# Altium PCB PCB1.PcbDoc
Units mm, origin at the board's own origin, x right, y up, seen from the top; angles counter-clockwise.
Board outline 152.4 x 101.6 mm, 2 copper layers (Top Layer, Bottom Layer); 131 components, 94 nets, 502 pads, 3 vias.
Unrouted connection lines stored in the file: 261.
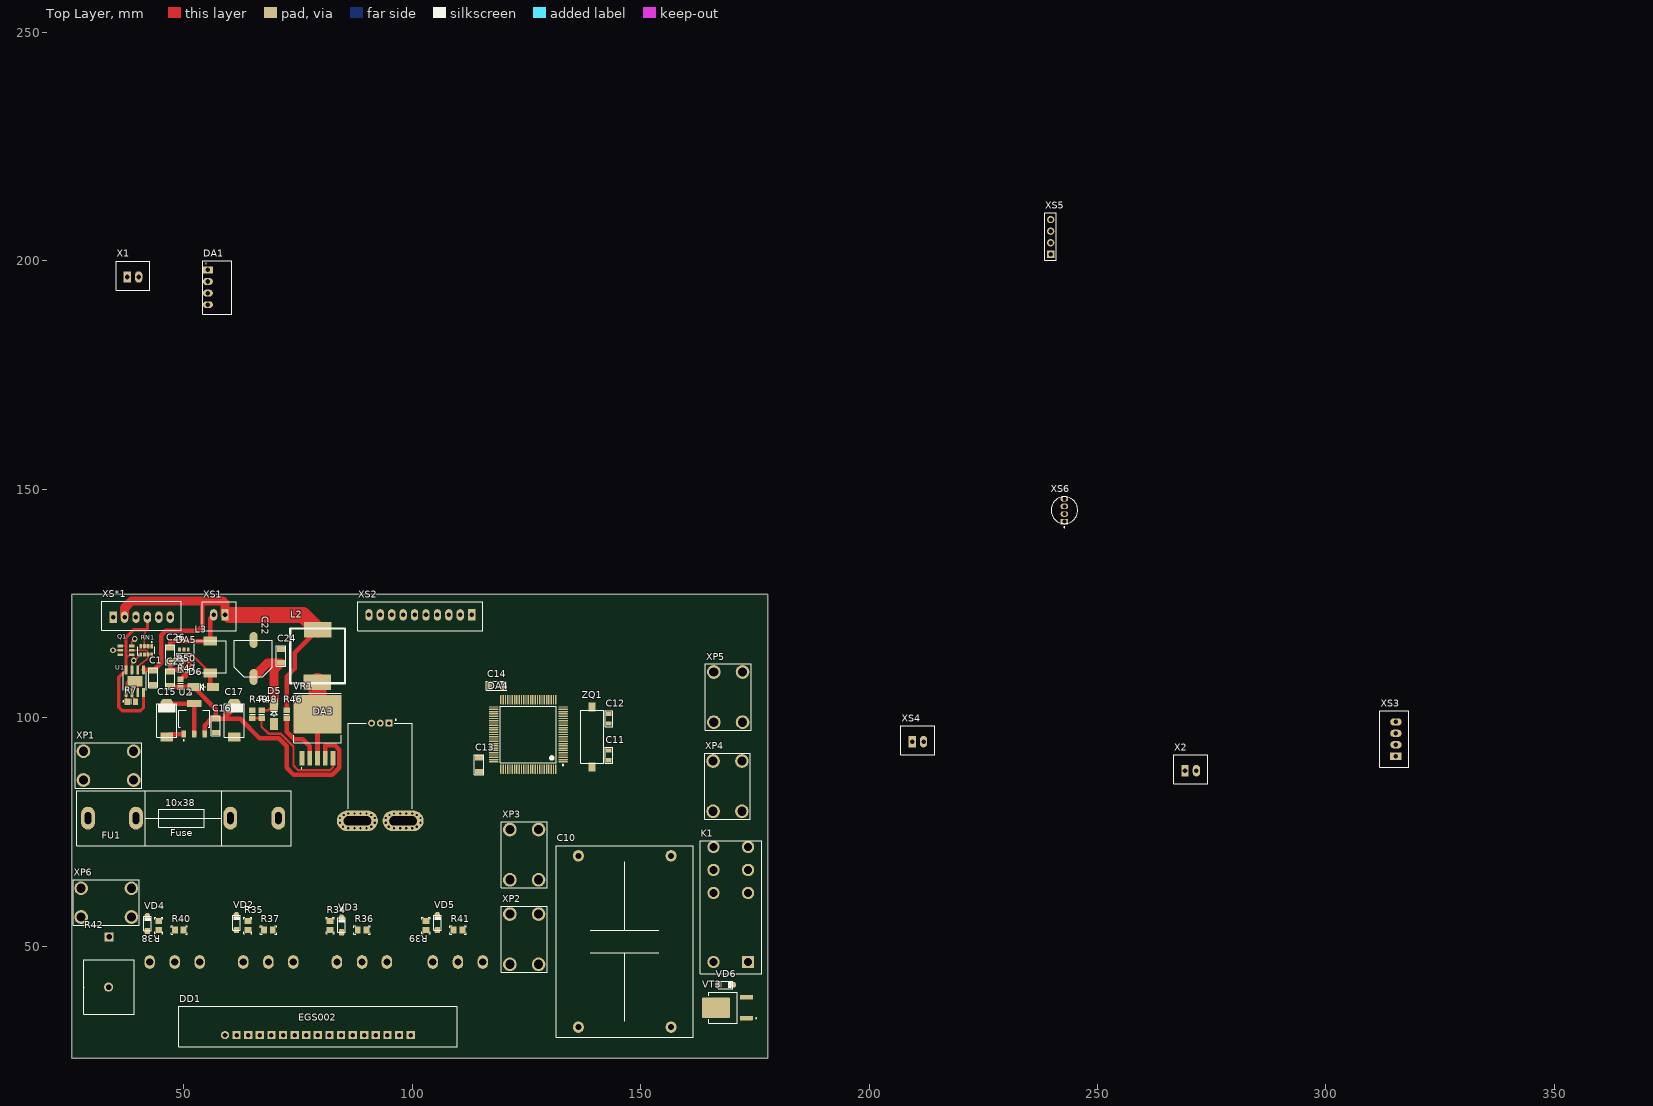
[diagram p0: Top Layer view]
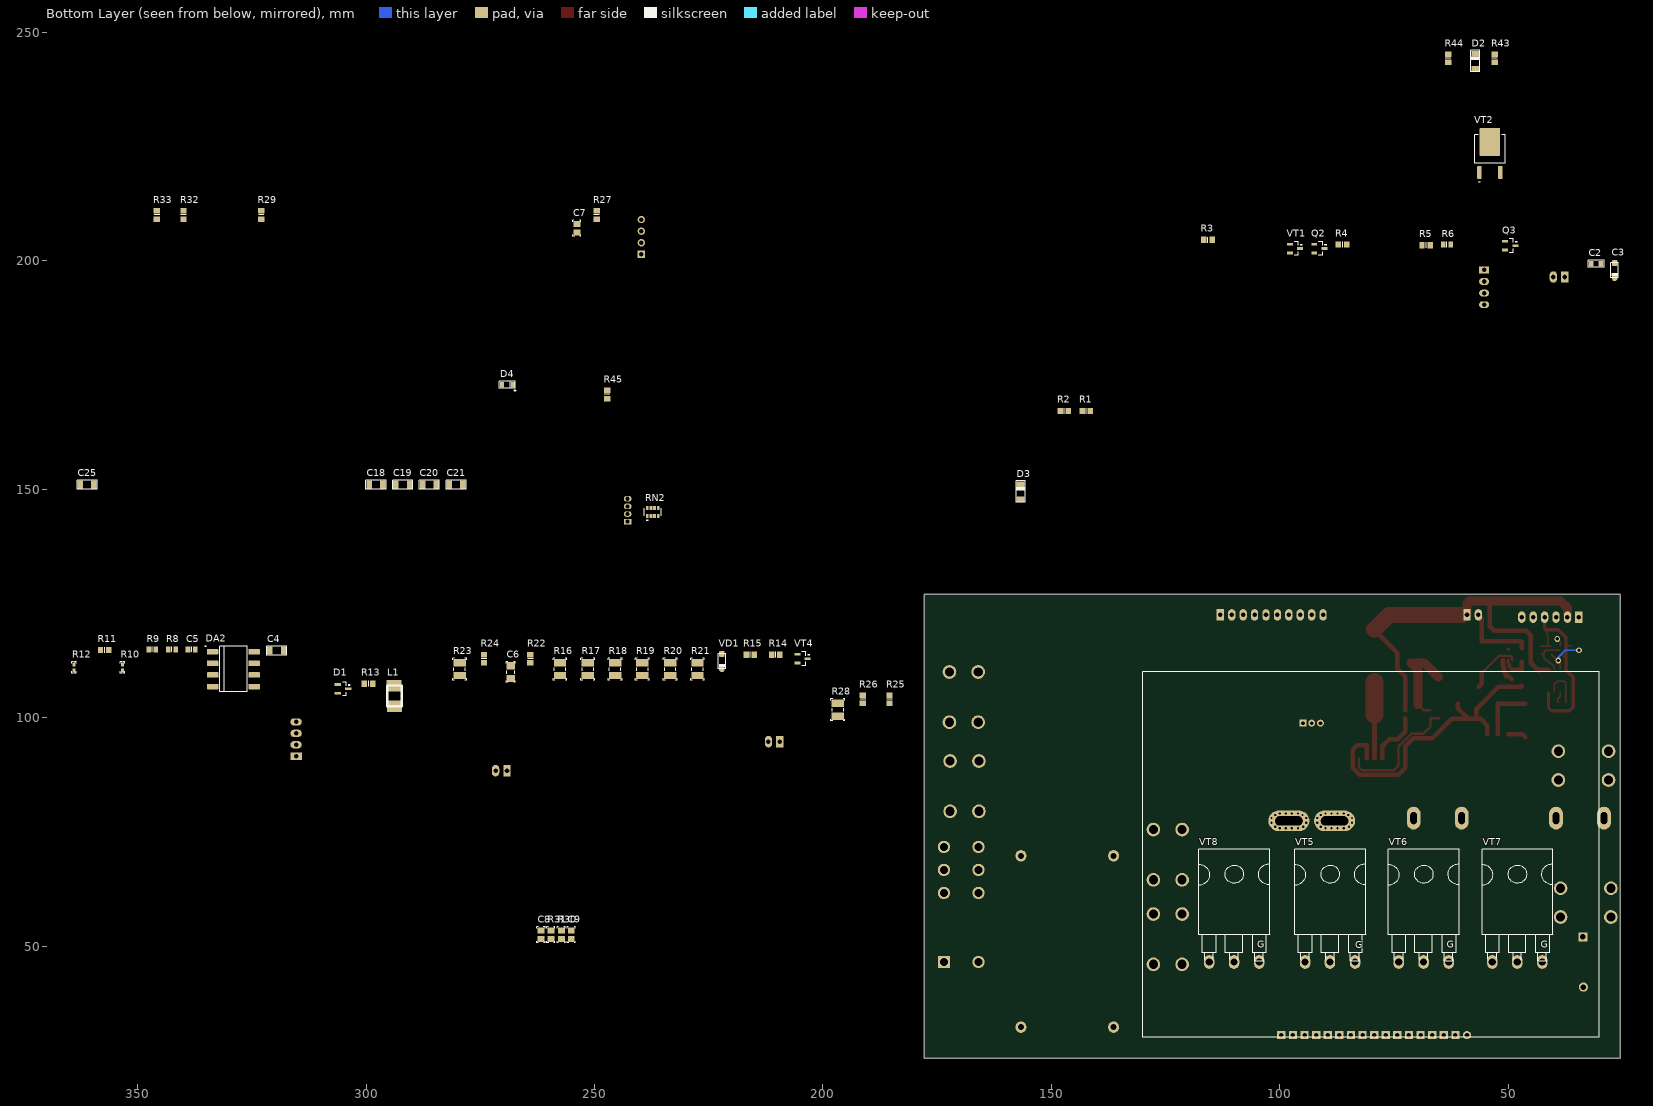
[diagram p1: Bottom Layer view, seen from below]

## Layer stack, top to bottom
Top Solder: solder mask 0.0102, Solder Resist, Dk 3.5
Top Layer: signal copper 0.0356
Dielectric 1: dielectric 0.32, FR-4, Dk 4.8
Bottom Layer: signal copper 0.0356
Bottom Solder: solder mask 0.0102, Solder Resist, Dk 3.5

## Board outline
25.4,25.4 177.8,25.4 177.8,127 25.4,127

## Design rules (kind name [scope] priority, off if disabled: settings)
Clearance [All] p1: gap=0.254 ignorepadtopadclearanceinfootprint=FALSE except(0: Arc-Hole Track-Hole SMDPad-Hole THPad-Hole Via-Hole Fill-Hole Poly-Hole Region-Hole Text-Hole)
DiffPairsRouting [All] p1: maxlimit=0.254 minlimit=0.254 mostfreqgap=0.254 toplayer_minwidth=0.381 toplayer_maxwidth=0.381 toplayer_prefwidth=0.381 bottomlayer_minwidth=0.381 bottomlayer_maxwidth=0.381 bottomlayer_prefwidth=0.381 maxuncoupledlength=12.7
PlaneConnect [All] p1: planeconnectstyle=Direct reliefexpansion=0.508 reliefentries=4 reliefconductorwidth=0.254 reliefairgap=0.254
PolygonConnect [All] p1: connectstyle=Direct reliefconductorwidth=0.254 reliefentries=4 polygonreliefangle="90 Angle" airgapwidth=0.254
RoutingVias [All] p1: holewidth=0.711 width=1.27 viastyle="Through Hole" minholewidth=0.711 minwidth=1.27 maxholewidth=0.711 maxwidth=1.27
SolderMaskExpansion [All] p1: expansion=0.102
Width [All] p1: maxlimit=10 minlimit=0.254 preferedwidth=0.254
28 further rules are at their usual default settings.

## Classes and differential pairs
component class Designator: DD1
differential pair CANRX: +CANRX_P -CANRX_N
differential pair CAN: +CAN_P -CAN_N
differential pair UART: +UART_P -UART_N

## Components (designator, comment, footprint, x,y, rotation, side; value= is the part's Value field where it differs from the comment)
C1 "1206" 1206C 43.25,110.25 r270 top value=10µF
C2 "100 nF" 0805_old 31.75,199.39 r180 bottom
C3 "TAJA226K010RNJ" "SMDA Tantal Polar" 26.67,196.342 r90 bottom
C4 "10 mkF" 1206C 321.056,114.681 r180 bottom
C5 "100 nF" 6-0805_L 338.201,114.935 r180 bottom
C6 "0.01u" 3216[1206] 268.351,109.982 r90 bottom value=0.1
C7 "0.1u" 2012[0805] 253.873,207.137 r90 bottom value=0.1
C8 "0.1" 2012[0805] 261.705,52.485 r270 bottom
C9 "0.1" 2012[0805] 255.101,52.485 r90 bottom
C10 "30u" B32776G 146.5,51 r270 top value=0.1м
C11 "30 pF" 0805_old 143.053,90.735 r90 top
C12 "30 pF" 0805_old 143.053,100.768 r270 top
C13 "10 mkF" 1206C 114.605,91.195 r270 top
C14 "10 mkF" 1206C 119.939,106.991 r180 top
C15 "47mkF 25V" "SMDD Tantal Polar" 46.25,103.05 r270 top
C16 "1206" 1206C 57,99.75 r270 top value=10µF
C17 "100mkF 16V" "SMDD Tantal Polar" 61,103.05 r270 top
C18 "10 mkF" 1206C 299.339,151.003 r180 bottom
C19 "10 mkF" 1206C 293.497,151.003 r180 bottom
C20 "10 mkF" 1206C 287.655,151.003 r180 bottom
C21 "10 mkF" 1206C 281.813,151.003 r180 bottom
C22 "220mkF 50V" "ECAP 220 35V" 61.05,108.9 r0 top
C23 "10 mkF" 1206C 47,107 r90 top
C24 "1µF" 1206C 71.25,115 r270 top
C25 "1206" 1206C 362.585,151.003 r180 bottom value=10µF
C26 "10 mkF" 1206C 47,115.25 r270 top
D1 "PESD1CAN,215" SOT23_M 305.054,106.299 r180 bottom
D2 "1N5819HW-7-F" "1206C Diode" 57.15,242.062 r90 bottom
D3 "1N5819HW-7-F" "1206C Diode" 156.718,147.828 r90 bottom
D4 "FYLS-0805UAC" 0805_3V3 270.058,172.88 r180 bottom
D5 "1N5824" "*DO214_SS14(Primary) - duplicate" 69.75,100.75 r90 top
D6 "SS34" "*DO214_SS14(Primary) - duplicate" 54.25,106.75 r180 top
DA1 "B0505S-1WR3" SIP4 55.245,196.723 r0 top
DA2 "ISO1050DUBR" ISO1050 329.057,110.617 r180 bottom
DA3 "ACS758" ACS758 92.99,98.8 r180 top
DA4 "STM32F407VET6" STM-LQFP100_M 125.4,96.323 r0 top
DA5 "" SOT23-6_L 50,113.75 r90 top
DD1 "EGS002" EGS002 59,30.5 r90 top
FU1 "10x38 20A (2xCQ-216)" "Fuse 10x38" 39.5,78 r0 top
K1 "G2RL1E24DC" G2RL1E24DC 173.5,46.5 r90 top
L1 "470mH" LQH43CN471K 298.196,104.775 r90 bottom
L2 "AC1050" CDRH127/LDNP-680MC 79.25,113.5 r270 top value=KSE-CD127NP-330MC
L3 "470mH" "MT3608 IND" 55.75,109.8 r90 top
Q1 "BC857BS,115" SOT95P280X145-6N 37.345,114.75 r180 top
Q2 "" SOT23_N 91.313,202.692 r180 bottom
Q3 "IRLML6244" SOT23_N 49.53,203.327 r180 bottom
R1 "330 Om" 6-0805_N 142.367,167.132 r180 bottom
R2 "10kOm" 6-0805_N 147.193,167.132 r180 bottom
R3 "10kOm" 6-0805_N 115.697,204.597 r180 bottom
R4 "330 Om" 6-0805_N 86.233,203.581 r180 bottom
R5 "330 Ом" 6-0805_N 67.945,203.454 r180 bottom
R6 "4k7" 6-0805_L 63.373,203.581 r180 bottom
R7 "0805" 6-0805_N 38.5,103.5 r0 top value="510 Om"
R8 "*" 6-0805_L 342.519,114.935 r180 bottom
R9 "*" 6-0805_L 346.837,114.935 r180 bottom
R10 "*" 1005[0402] 353.314,110.998 r90 bottom
R11 "120 Ом" 6-0805_N 357.251,114.808 r180 bottom
R12 "*" 1005[0402] 363.982,110.998 r90 bottom
R13 "0805" 6-0805_N 299.466,107.442 r180 bottom value="220 om"
R14 "0805" 6-0805_N 210.312,113.792 r180 bottom value="1.3 kOm"
R15 "0805" 6-0805_N 215.9,113.792 r180 bottom value=10k
R16 "*" 3225[1210] 257.556,110.617 r90 bottom
R17 "*" 3225[1210] 251.46,110.617 r90 bottom
R18 "*" 3225[1210] 245.491,110.617 r90 bottom
R19 "*" 3225[1210] 239.522,110.617 r90 bottom
R20 "*" 3225[1210] 233.426,110.617 r90 bottom
R21 "*" 3225[1210] 227.457,110.617 r90 bottom
R22 "0805" 6-0805_N 264.033,112.903 r90 bottom value=330Om
R23 "*" 3225[1210] 279.527,110.617 r90 bottom
R24 "0805" 6-0805_N 274.193,112.903 r90 bottom value="2.7 kOm"
R25 "0805" 6-0805_N 185.42,104.013 r90 bottom value=1k
R26 "4.7kOm" 6-0805_N 191.262,104.013 r90 bottom
R27 "10k" 6-0805_N 249.555,210.058 r90 bottom
R28 "*" 3225[1210] 196.723,101.727 r90 bottom
R29 "0805" 6-0805_N 322.961,210.058 r90 bottom value=47k
R30 "*" 2012[0805] 257.26,52.485 r270 bottom
R31 "*" 2012[0805] 259.546,52.485 r90 bottom
R32 "4.7kOm" 6-0805_N 339.979,210.058 r90 bottom
R33 "0805" 6-0805_N 345.821,210.058 r90 bottom value=47k
R34 "*" 2012[0805] 82,54.5 r270 top
R35 "*" 2012[0805] 64,54.5 r270 top
R36 "*" 2012[0805] 89,53.5 r0 top
R37 "*" 2012[0805] 68.5,53.5 r0 top
R38 "*" 2012[0805] 44.5,54.5 r270 top
R39 "*" 2012[0805] 103,54.5 r270 top
R40 "*" 2012[0805] 49,53.5 r0 top
R41 "*" 2012[0805] 110,53.5 r0 top
R42 "0.1" "5W-0.1 draw" 33.6,47.013 r270 top
R43 "4.7kOm" 6-0805_N 52.959,244.348 r90 bottom
R44 "4.7kOm" 6-0805_N 63.119,244.348 r90 bottom
R45 "1kOm" 6-0805_N 247.25,170.75 r90 bottom
R46 "0805" 6-0805_N 72.5,100.75 r90 top value=1kOm
R47 "0805" 6-0805_N 49.25,107.5 r270 top value=8.2k
R48 "0805" 6-0805_N 67,100.75 r90 top value=6.8kOm
R49 "0805" 6-0805_N 65,100.75 r270 top value=1.1kOm
R50 "0805" 6-0805_N 50,110.5 r0 top value=1.1k
RN1 "*" RESCAV80P320X160X70-8N 41.75,114.75 r270 top value=YC164-JR-071KL
RN2 "*" RESCAV80P320X160X70-8N 237.25,145 r90 bottom value=YC164-JR-07200RL
U1 "*" SOP127P600X175-9N 39.25,108 r90 top
U2 "AMS1117" SOT229P700X180-4N 52.25,99.75 r90 top
VD1 "SK-24" "SMDA diode" 222.123,110.744 r90 bottom
VD2 "*" "SMDA diode" 61.5,56.7 r270 top
VD3 "*" "SMDA diode" 84.5,56.2 r270 top
VD4 "*" "SMDA diode" 42,56.5 r270 top
VD5 "*" "SMDA diode" 105.5,56.7 r270 top
VD6 "*" "SMDA diode" 170.2,41.5 r180 top
VR1 "*" xl6009 79.25,97.25 r90 top
VT1 "IRLM0040" SOT23_N 96.647,202.692 r180 bottom
VT2 "*" DPAK229P990X239-3N 53.975,223.52 r90 bottom
VT3 "*" DPAK229P990X239-3N 169.01,36.5 r180 top
VT4 "IRLM0040" SOT23_N 204.47,112.903 r180 bottom
VT5 "VT Transistor IGBT" to247-hor 89,46.5 r180 bottom
VT6 "VT Transistor IGBT" to247-hor 68.5,46.5 r180 bottom
VT7 "VT Transistor IGBT" to247-hor 48,46.5 r180 bottom
VT8 "VT Transistor IGBT" to247-hor 110,46.5 r180 bottom
X1 "fan" CWF-2 37.592,196.469 r0 top
X2 "NTC/10K" CWF-2 269.153,88.392 r0 top
XP1 "AB+" "K13 М4*9(DECA SwitchLab)" 33.5,89.5 r90 top
XP2 "L1" "K13 М4*9(DECA SwitchLab)" 124.5,51.5 r180 top
XP3 "L2" "K13 М4*9(DECA SwitchLab)" 124.5,70 r180 top
XP4 "230" "K13 М4*9(DECA SwitchLab)" 169,85 r0 top
XP5 "230" "K13 М4*9(DECA SwitchLab)" 169.15,104.5 r0 top
XP6 "AB-" "K13 М4*9(DECA SwitchLab)" 33,59.5 r270 top
XS1 "WJ15EDGVC-3.5-2P" CWF-2 59,122.5 r180 top
XS2 "CWF-10R" CWF-10 113,122.5 r180 top
XS3 "CWF-4" CWF-4 315.341,91.567 r90 top
XS4 "WJ15EDGVC-3.5-2P" CWF-2 209.423,94.742 r0 top
XS5 "WJ15EDGVC-3.5-4P" "PLS-4 - duplicate" 239.75,201.42 r90 top
XS6 "5 RGB 500-1000mcd" "5 RGB 500-1000mcd" 242.75,145.415 r90 top
XS*1 "*" CWF-6 34.5,122 r0 top
ZQ1 "HC-49S" "HC 49SM" 139.37,98.228 r270 top

## Footprints (in the part's own frame and the unit in brackets; to place one, negate y for a bottom-side part, rotate by r counter-clockwise, add the part's x,y. Pads: shape width x height; smd on the part's side, far side on the other; paste and mask are expansions set on the pad)
"5 RGB 500-1000mcd" [mm]
  rect 1.2x1.7 hole 0.9: 1(-2.505,0)
  oval 1.2x1.7 hole 0.9: 2(-0.835,0) 3(0.835,0) 4(2.505,0)
  silkscreen extent -3.8,-2.93 2.92,2.93, body extent -3.18,-3.18 3.18,3.18, height 15
"5W-0.1 draw" [mm]
  rect 2x2 hole 1.2: 1(-5,0)
  round 2 hole 1.2: 2(6.013,-0.1)
  silkscreen extent 0,-5.5 12.03,5.5
6-0805_L [mm] "Chip Resistor, Body 2.0x1.2mm, IPC High Density"
  rect 1x1.3 smd: 1(-0.8,0) 2(0.8,0)
  silkscreen extent 0,-0.55 0,0.55, body extent -1.07,-0.7 1.07,0.7, height 0.7
6-0805_N [mm] "Chip Resistor, Body 2.0x1.2mm, IPC Medium Density"
  rect 1.2x1.4 smd: 1(-0.9,0) 2(0.9,0)
  silkscreen extent 0,-0.6 0,0.6, body extent -1.07,-0.7 1.07,0.7, height 0.7
0805_3V3 [mm]
  rect 0.9x1.2 smd: 1(-0.2,0) 2(2.2,0)
  silkscreen extent -0.75,-1.37 2.77,0.8, body extent -0.05,-0.7 2.1,0.7, height 0.7
0805_old [mm]
  rect 0.9x1.2 smd: 1(-0.05,0) 2(2.05,0)
  silkscreen extent -0.75,-0.8 2.75,0.8, body extent -0.07,-0.67 2.08,0.73, height 0.7
1005[0402] [mm] "Chip Resistor; Body 1.1 x 0.5 mm (LxW typ)"
  rect 0.9x0.7 smd: 1(-0.65,0) 2(0.65,0)
  silkscreen extent -1.27,-0.51 1.27,0.51, body extent -0.51,-0.25 0.51,0.25, height 0.41
1206C [mm]
  rect 1.2x1.8 smd: 1(0,0) 2(3,0)
  silkscreen extent -0.7,-1 3.7,1, body extent -0.1,-0.8 3.1,0.76, height 1.73
"1206C Diode" [mm]
  rect 1.2x1.8 smd: 1(0,0) 2(3.3,0)
  silkscreen extent -0.7,-1 4,1, body extent 0.07,-0.78 3.27,0.78, height 1.73
2012[0805] [mm] "Chip Resistor; Body 2.0 x 1.3 mm (LxW typ)"
  rect 1.3x1.5 smd: 1(-0.95,0) 2(0.95,0)
  silkscreen extent -1.78,-0.89 1.78,0.89, body extent -1.02,-0.64 1.02,0.64, height 0.5
3216[1206] [mm] "Chip Resistor; Body 3.2 x 1.6 mm (LxW typ)"
  rect 1.6x1.8 smd: 1(-1.4,0) 2(1.4,0)
  silkscreen extent -2.29,-1.02 2.29,1.02, body extent -1.52,-0.76 1.52,0.76, height 0.5
3225[1210] [mm] "Chip Resistor; Body 3.2 x 2.5 mm (LxW typ)"
  rect 1.6x2.7 smd: 1(-1.4,0) 2(1.4,0)
  silkscreen extent -2.41,-1.52 2.41,1.52, body extent -1.52,-1.29 1.52,1.25, height 0.71
"*DO214_SS14(Primary) - duplicate" [mm]
  rect 2.65x1.75 smd: 1(-2.15,0) 2(2.15,0)
  silkscreen extent -0.57,-0.7 3.02,1.72, body extent -2.64,-1.81 2.7,1.81, height 2.65
ACS758 [mm]
  rect 1.5x1.5 / inner round 1.5 / far side rect 1.5x1.5 hole 0.8: 1(-1.91,0)
  round 1.5 hole 0.8: 2(0,0) 3(1.91,0)
  oval 9x4.5 hole 2 slot 6 at 0 deg: 4(5,21.4) 5(-5,21.4)
  round 0.8 hole 0.5: 4_1(3,19.8) 4_2(4.33,19.8) 4_3(5.66,19.8) 4_4(6.99,19.8) 4_5(8,20.13) 4_6(8.8,20.75) 4_7(8.8,21.8) 4_8(8.15,22.7) 4_9(6.99,23) 4_10(5.66,23) 4_11(4.33,23) 4_12(3,23) 4_13(2,22.7) 4_14(1.2,21.8) 4_15(1.2,20.75) 4_16(2,20.13) 5_1(-7,19.8) 5_2(-5.67,19.8) 5_3(-4.34,19.8) 5_4(-3.01,19.8) 5_5(-8,20.13) 5_6(-8.8,20.75) 5_7(-8.8,21.8) 5_8(-8,22.7) 5_9(-7,23) 5_10(-5.67,23) 5_11(-4.34,23) 5_12(-3.01,23) 5_13(-1.85,22.7) 5_14(-1.2,21.8) 5_15(-1.2,20.75) 5_16(-2,20.13)
  silkscreen extent -7,-0.82 7,18.76, body extent -7.25,0.13 6.75,22.71, height 7.1
B32776G [mm] "EPCOS CAP"
  oval 2.5x2.4 hole 1.3: 1(-18.75,10.15) 1(-18.75,-10.15) 2(18.75,10.15) 2(18.75,-10.15)
  silkscreen extent -21,-15 21,15
CDRH127/LDNP-680MC [mm]
  rect 3.4x6 smd: 1(-5.75,0.05) 2(5.725,-0.025)
  silkscreen extent -6,-6 6,6, body extent -5.95,-6.02 6,5.92, height 8
CWF-2 [mm]
  rect 1.6x2.5 hole 1: 1(0,0)
  oval 1.6x2.5 hole 1: 2(2.5,0)
  silkscreen extent -2.45,-2.85 4.95,3.5, body extent -2.45,-2.85 4.95,3.47, height 8
CWF-4 [mm]
  rect 1.6x2.5 hole 1: 1(0,0)
  oval 1.6x2.5 hole 1: 2(2.5,0) 3(5,0) 4(7.5,0)
  silkscreen extent -2.45,-2.85 9.95,3.5, body extent -2.45,-2.85 9.95,3.47, height 8
CWF-6 [mm]
  rect 1.6x2.5 hole 1: 1(0,0)
  oval 1.6x2.5 hole 1: 2(2.5,0) 3(5,0) 4(7.5,0) 5(10,0) 6(12.5,0)
  silkscreen extent -2.45,-2.85 14.95,3.5, body extent -2.42,-2.83 14.95,3.5, height 8
CWF-10 [mm]
  rect 1.6x2.5 hole 1: 1(0,0)
  oval 1.6x2.5 hole 1: 2(2.5,0) 3(5,0) 4(7.5,0) 5(10,0) 6(12.5,0) 7(15,0) 8(17.5,0) 9(20,0) 10(22.5,0)
  silkscreen extent -2.45,-2.85 24.95,3.5, body extent -2.42,-2.83 24.95,3.5, height 8
DPAK229P990X239-3N [mm]
  rrect25% 2.83x0.97 smd: 1(-4.14,2.29) 3(-4.14,-2.29)
  rrect10% 6.1x4.49 smd paste-4: 2(2.51,0)
  silkscreen extent -6.35,-3.37 4.1,3.37
"ECAP 220 35V" [mm] "TO, Thru-Hole, Vertical, Heatsink Mounted; 3 In-Line Leads; Pitch 2.54 mm"
  oval 1.8x3.5 smd: 1(4.2,0) 2(4.2,8.1)
  silkscreen extent 0,0 8.3,8, body extent 0,0 8.3,8.02, height 10.5
EGS002 [mm]
  round 1.8 hole 1: 1(0,0)
  rect 1.8x1.8 / inner round 1.8 / far side rect 1.8x1.8 hole 1: 2(0,-2.54) 3(0,-5.08) 4(0,-7.62) 5(0,-10.16) 6(0,-12.7) 7(0,-15.24) 8(0,-17.78) 9(0,-20.32) 10(0,-22.86) 11(0,-25.4) 12(0,-27.94) 13(0,-30.48) 14(0,-33.02) 15(0,-35.56) 16(0,-38.1) 17(0,-40.64)
  silkscreen extent -2.54,-50.8 6.35,10.16, body extent -0.15,-50.82 4.95,10.18, height 32
"Fuse 10x38" [mm]
  oval 3x5 hole 1.4 slot 2.6 at 90 deg: 1(-10.5,0) 1(0,0) 2(20.67,0) 2(31.17,0)
  silkscreen extent -13,-6.1 34,6
G2RL1E24DC [mm] "relay"
  round 2.7 hole 1.7: 1(0,7.56) 2(15.12,7.56) 3(20.16,7.56) 4(25.2,7.56) 5(25.2,0) 6(20.16,0) 7(15.12,0)
  rect 2.7x2.7 hole 1.7: 8(0,0)
  silkscreen extent -2.6,-3 26.5,10.5, body extent -2.6,-3 26.5,10.5, height 15.7
"HC 49SM" [mm]
  rect 2x1.5 smd: 1(-4.125,0) 2(9,0)
  silkscreen extent -3.37,-2.52 8.25,2.58, body extent -3.37,-2.5 8.25,2.58, height 4
ISO1050 [mm]
  rrect25% 2.5x1.2 smd: 1(-4.535,3.81) 2(-4.535,1.27) 3(-4.535,-1.27) 4(-4.535,-3.81) 5(4.535,-3.81) 6(4.535,-1.27) 7(4.535,1.27) 8(4.535,3.81)
  silkscreen extent -6.2,-5 3,5.1, body extent -5.28,-4.67 5.12,4.62, height 4.85
"K13 М4*9(DECA SwitchLab)" [mm] "Quartz TrueHole"
  round 3 hole 2: 1(-3.15,5.5) 1(-3.15,-5.5) 1(3.15,5.5) 1(3.15,-5.5)
  silkscreen extent -5,-7.25 5,7.25, body extent -3.89,-3.9 3.98,3.98, height 7.95
LQH43CN471K [mm]
  rect 2.5x3.2 smd: 1(-2.25,-4.4) 2(2.25,-4.3)
  silkscreen extent -2.25,-6 2.25,-2.8, body extent -2.22,-6 2.25,-2.83, height 2.7
"MT3608 IND" [mm]
  rect 2x3 smd: 1(0,0) 2(6.95,0)
  silkscreen extent 0,-3.5 7,3.5, body extent -0.05,-3.55 7,3.5, height 4.5
"PLS-4 - duplicate" [mm]
  rect 1.6x1.6 hole 1: 1(0,0)
  round 1.6 hole 1: 2(2.54,0) 3(5.08,0) 4(7.62,0)
  silkscreen extent -1.27,-1.27 9.1,1.3
RESCAV80P320X160X70-8N [mm]
  rrect25% 0.9x0.63 smd: 1(-0.885,1.2) 2(-0.885,0.4) 3(-0.885,-0.4) 4(-0.885,-1.2) 5(0.885,-1.2) 6(0.885,-0.4) 7(0.885,0.4) 8(0.885,1.2)
  silkscreen extent -1.9,-1.83 0.8,1.83
SIP4 [mm]
  rect 2.2x1.5 hole 1: 1(0,1.3)
  oval 2.2x1.5 hole 1: 2(0,-1.24) 3(0,-3.78) 4(0,-6.32)
  silkscreen extent -1.1,-8.36 5.23,3.3, body extent -0.95,-8.37 5.15,3.23, height 10.16
"SMDA diode" [mm] "Chip Resistor, Body 2.0x1.2mm, IPC High Density"
  rrect50% 1.4x1.2 smd: 1(3.2,0)
  oct 1.4x1.2 smd: 2(0,0)
  silkscreen extent 0,-0.8 3.2,0.8
"SMDA Tantal Polar" [mm] "Chip Resistor, Body 2.0x1.2mm, IPC High Density"
  oct 1.4x1.2 smd: 1(0,0)
  rrect50% 1.4x1.2 smd: 2(3.2,0)
  silkscreen extent 0,-0.8 3.2,0.8
"SMDD Tantal Polar" [mm] "Chip Resistor, Body 2.0x1.2mm, IPC High Density"
  oct 2x2.8 smd: 1(0,0)
  rect 2x2.8 smd: 2(7.3,0)
  silkscreen extent 0,-2.16 7.37,2.16, body extent 0,-2.12 7.3,2.18, height 4.01
SOP127P600X175-9N [mm]
  rrect25% 1.97x0.6 smd: 1(-2.475,1.905) 2(-2.475,0.635) 3(-2.475,-0.635) 4(-2.475,-1.905) 5(2.475,-1.905) 6(2.475,-0.635) 7(2.475,0.635) 8(2.475,1.905)
  rect 2.26x3.302 smd paste-3: 9(0,0)
  silkscreen extent -4.54,-2.55 2,2.6, body extent -3,-2.45 3,2.45, height 1.75
SOT23-6_L [mm] "SOT23, 6-Leads, Body 2.9x1.6mm, Pitch 0.95mm, Lead Span 2.7mm, IPC High Density"
  rect 0.9x0.65 smd: 1(-1.2,0.95) 2(-1.2,0) 3(-1.2,-0.95) 4(1.2,-0.95) 5(1.2,0) 6(1.2,0.95)
  silkscreen extent -1.32,-1.55 0.35,1.95, body extent -0.9,-1.55 0.9,1.55, height 1.45
SOT23_M [mm] "SOT23, 3-Leads, Body 2.9x1.3mm, Pitch 0.95mm, Lead Span 2.3mm - Reverse Pinning, IPC Low Density"
  rect 1.45x0.6 smd: 1(1.175,0) 2(-1.175,-0.95) 3(-1.175,0.95)
  silkscreen extent -0.1,-1.5 1.47,1.5, body extent -0.7,-1.5 0.7,1.5, height 1.1
SOT23_N [mm] "SOT23, 3-Leads, Body 2.9x1.3mm, Pitch 0.95mm, Lead Span 2.3mm - Reverse Pinning, IPC Medium Density"
  rect 1.3x0.6 smd: 1(-1.125,0.95) 2(-1.125,-0.95) 3(1.125,0)
  silkscreen extent -0.2,-1.5 1.47,1.5, body extent -0.7,-1.5 0.7,1.5, height 1.1
SOT95P280X145-6N [mm]
  rect 1.21x0.59 smd: 1(-1.255,0.95) 2(-1.255,0) 3(-1.255,-0.95) 4(1.255,-0.95) 5(1.255,0) 6(1.255,0.95)
  silkscreen extent -2.66,0.85 -2.46,1.05, body extent -1.4,-1.45 1.4,1.45, height 1.45
SOT229P700X180-4N [mm]
  rrect15% 1.5x0.93 smd: 1(-3.345,2.29) 2(-3.345,0) 3(-3.345,-2.29)
  rrect15% 1.5x3.24 smd: 4(3.345,0)
  silkscreen extent -4.8,-3.36 1.86,3.36
STM-LQFP100_M [mm] "Thin QFP, 100-Leads, Body 14x14mm, Pitch 0.5mm, IPC Low Density"
  oval 2.1x0.3 smd: 1(7.6,-6) 2(7.6,-5.5) 3(7.6,-5) 4(7.6,-4.5) 5(7.6,-4) 6(7.6,-3.5) 7(7.6,-3) 8(7.6,-2.5) 9(7.6,-2) 10(7.6,-1.5) 11(7.6,-1) 12(7.6,-0.5) 13(7.6,0) 14(7.6,0.5) 15(7.6,1) 16(7.6,1.5) 17(7.6,2) 18(7.6,2.5) 19(7.6,3) 20(7.6,3.5) 21(7.6,4) 22(7.6,4.5) 23(7.6,5) 24(7.6,5.5) 25(7.6,6) 51(-7.6,6) 52(-7.6,5.5) 53(-7.6,5) 54(-7.6,4.5) 55(-7.6,4) 56(-7.6,3.5) 57(-7.6,3) 58(-7.6,2.5) 59(-7.6,2) 60(-7.6,1.5) 61(-7.6,1) 62(-7.6,0.5) 63(-7.6,0) 64(-7.6,-0.5) 65(-7.6,-1) 66(-7.6,-1.5) 67(-7.6,-2) 68(-7.6,-2.5) 69(-7.6,-3) 70(-7.6,-3.5) 71(-7.6,-4) 72(-7.6,-4.5) 73(-7.6,-5) 74(-7.6,-5.5) 75(-7.6,-6)
  oval 0.3x2.1 smd: 26(6,7.6) 27(5.5,7.6) 28(5,7.6) 29(4.5,7.6) 30(4,7.6) 31(3.5,7.6) 32(3,7.6) 33(2.5,7.6) 34(2,7.6) 35(1.5,7.6) 36(1,7.6) 37(0.5,7.6) 38(0,7.6) 39(-0.5,7.6) 40(-1,7.6) 41(-1.5,7.6) 42(-2,7.6) 43(-2.5,7.6) 44(-3,7.6) 45(-3.5,7.6) 46(-4,7.6) 47(-4.5,7.6) 48(-5,7.6) 49(-5.5,7.6) 50(-6,7.6) 76(-6,-7.6) 77(-5.5,-7.6) 78(-5,-7.6) 79(-4.5,-7.6) 80(-4,-7.6) 81(-3.5,-7.6) 82(-3,-7.6) 83(-2.5,-7.6) 84(-2,-7.6) 85(-1.5,-7.6) 86(-1,-7.6) 87(-0.5,-7.6) 88(0,-7.6) 89(0.5,-7.6) 90(1,-7.6) 91(1.5,-7.6) 92(2,-7.6) 93(2.5,-7.6) 94(3,-7.6) 95(3.5,-7.6) 96(4,-7.6) 97(4.5,-7.6) 98(5,-7.6) 99(5.5,-7.6) 100(6,-7.6)
  silkscreen extent -6.15,-6.82 7.73,6.15, body extent -7,-7 7,7, height 1.6
to247-hor [mm] "TO, Thru-Hole, Vertical, Heatsink Mounted; 3 In-Line Leads; Pitch 2.54 mm"
  oval 2.3x3 hole 1.6: 1(5.5,0) 2(0,0) 3(-5.44,0)
  silkscreen extent -7.7,0.2 7.8,24.7, body extent -7.7,-0.7 7.8,24.7, height 6.4
xl6009 [mm]
  rect 3.21x1.05 smd: 1(-6.13,3.4) 2(-6.13,1.7) 3(-6.13,0) 4(-6.13,-1.7) 5(-6.13,-3.4)
  rect 8.46x10.53 smd paste-6: 6(3.5,0)
  silkscreen extent -8.4,-5.18 8.05,5.18, body extent -7.17,-5.08 7.18,5.08, height 4.65

## Part data
C1 C16 C24 C25: library part Cap, "Capacitor", LatestRevisionDate=17-Jul-2002, LatestRevisionNote="Re-released for DXP Platform.", PackageDescription="Radial Cap, Thru-Hole; 2 Leads; 0.3 in Pin Spacing", PackageReference=RAD-0.3, Published=8-Jun-2000, Publisher="Altium Limited"
C2 C5: library part Cap, "50V 100nF X7R ±10% 0805 Multilayer Ceramic Capacitors MLCC - SMD/SMT ROHS", Manufacturer=YAGEO, Footprint Type=SMD, LCPN=C49678, MFPN=CC0805KRX7R9BB104, Supplier=LC, Symbol=Capacitor, Type=Capacitors, URL=https://www.lcsc.com/product-detail/Multilayer-Ceramic-Capacitors-MLCC-SMD-SMT_YAGEO-CC0805KRX7R9BB104_C49678.html
C3: library part "Cap Pol2", Manufacturer=AVX, Footprint Type=SMD, MFPN=TAJA226K010RNJ, Supplier=LC, Symbol=Capacitor, Type=Capacitors
C4 C13 C14 C18 C19 C20 C21 C23 C26: library part Cap, "50V 10uF X5R ±10% 1206 Multilayer Ceramic Capacitors MLCC - SMD/SMT ROHS", Manufacturer=YAGEO, Footprint Type=SMD, LCPN=C100122, MFPN=CC1206KKX5R9BB106, Supplier=LC, Symbol=Capacitor, Type=Capacitors, URL=https://www.lcsc.com/product-detail/Multilayer-Ceramic-Capacitors-MLCC-SMD-SMT_YAGEO-CC1206KKX5R9BB106_C100122.html
C6 C7 C8 C9: library part C-4del, "Конденсатор", Manufacturer=Murata, ManufacturerPartNumber="GRM21B X7R 104 50V", Power/Voltage=50В, Tolerance=10%, Specification=K, TKE/TKC=X7R, Type=Конденсатор
C10: library part "C nonpol", "Конденсатор", Manufacturer=Murata, ManufacturerPartNumber=GRM21_R71H104, Power/Voltage=50В, Tolerance=10%, Specification=K, TKE/TKC=X7R, Type=Конденсатор
C11 C12: library part Cap, "50V 30pF NP0 ±5% 0805 Multilayer Ceramic Capacitors MLCC - SMD/SMT ROHS", Manufacturer=YAGEO, Footprint Type=SMD, LCPN=C107114, MFPN=CC0805JRNPO9BN300, Supplier=LC, Symbol=Capacitor, Type=Capacitors, URL=https://www.lcsc.com/product-detail/Multilayer-Ceramic-Capacitors-MLCC-SMD-SMT_YAGEO-CC0805JRNPO9BN300_C107114.html
C15: library part "Cap Pol2", "47uF 25V 700m? ±10% 2917 Tantalum Capacitors ROHS", Manufacturer="Vishay Intertech", Footprint Type=SMDD, LCPN=C1953049, MFPN=293D476X9025D2TE3, Supplier=LC, Symbol="Tantalum Capacitor", Type="Tantalum Capacitors", URL=https://www.lcsc.com/product-detail/Tantalum-Capacitors_Vishay-Intertech-293D476X9025D2TE3_C1953049.html
C17 C22: library part "Cap Pol2", "220uF 50V 220mA@120Hz ±20% SMD,10x10.5mm Aluminum Electrolytic Capacitors - SMD ROHS", Manufacturer=KNSCHA, Footprint Type=SMD, LCPN=C5354991, MFPN=126RV0004, Supplier=LC, Symbol=Capacitor, Type="Aluminum Electrolytic Capacitors", URL=https://www.lcsc.com/product-detail/Aluminum-Electrolytic-Capacitors-SMD_KNSCHA-126RV0004_C5354991.html
D1: library part Diode, "25.4V 70V Bi-Directional 24V SOT-23(TO-236) ESD Protection Devices ROHS", Manufacturer=Nexperia, Footprint Type=SMD, LCPN=C15771, MFPN=PESD1CAN,215, Supplier=LC, Symbol="Protection Device", Type="Protection Devices", URL=https://www.lcsc.com/product-detail/span-style-background-color-ff0-ESD-span-Protection-Devices_Nexperia-PESD1CAN-215_C15771.html
D2 D3: library part Diode, "40V 450mV@1A 1A SOD-123 Schottky Barrier Diodes (SBD) ROHS", Manufacturer="Diodes Incorporated", Footprint Type=SMD, LCPN=C82544, MFPN=1N5819HW-7-F, Supplier=LC, Symbol="Schottky Barrier Diode", Type="Schottky Barrier Diodes", URL=https://www.lcsc.com/product-detail/Schottky-Barrier-Diodes-SBD_Diodes-Incorporated-1N5819HW-7-F_C82544.html
D4: library part LED2, "Colorless transparence -40?~+85? 598nm~608nm Orange 120° 40mW 0805 Light Emitting Diodes (LED) ROHS", Manufacturer="Yongyu Photoelectric", Footprint Type=SMD, LCPN=C434437, MFPN=FYLS-0805UAC, Supplier=LC, Symbol=LED, Type=LED, URL=https://www.lcsc.com/product-detail/Light-Emitting-Diodes-LED_Yongyu-Photoelectric-SZYY0805O_C434437.html
D5 D6: library part Diode, "SMB(DO-214AA) Schottky Barrier Diodes (SBD) ROHS", Manufacturer=TWGMC, Footprint Type=SMB, LCPN=C5204947, MFPN=SS24, Supplier=LC, Symbol="Schottky Barrier Diode", Type="Schottky Barrier Diodes", URL=https://www.lcsc.com/product-detail/Schottky-Barrier-Diodes-SBD_TWGMC-SS24_C5204947.html
DA1: library part B1205S-1WR3, "5V 200mA 10.8V~13.2V 1W 80% Plugin Power Modules ROHS", Manufacturer="MORNSUN Guangzhou S& T", Footprint Type=DIP, LCPN=C970821, MFPN=B1205S-1WR3, Supplier=LC, Symbol="Power Module", Type="Power Modules", URL=https://www.lcsc.com/product-detail/Power-Modules_MORNSUN-Guangzhou-S-T-B1205S-1WR3_C970821.html
DA2: "1Mbps SOP-8 CAN ICs ROHS", Manufacturer="Texas Instruments", Footprint Type=SMD, LCPN=C16428, MFPN=ISO1050DUBR, Supplier=LC, Symbol="CAN IC", Type="CAN ICs", URL=https://www.lcsc.com/product-detail/CAN-ICs_Texas-Instruments-ISO1050DUBR_C16428.html
DA3: library part ACS758LCB-050B, "DC датчик тока"
DA4: library part STM32F407VGT7, "512KB 1.8V~3.6V ARM Cortex-M4 192KB 168MHz FLASH 82 LQFP-100(14x14) Microcontroller Units (MCUs/MPUs/SOCs) ROHS", Manufacturer=STMicroelectronics, Footprint Type=SMD, LCPN=C28730, MFPN=STM32F407VET6, Supplier=LC, Symbol=Microcontroller, Type=Microcontrollers, URL=https://www.lcsc.com/product-detail/Microcontroller-Units-MCUs-MPUs-SOCs_STMicroelectronics-STM32F407VET6_C28730.html
DA5: library part MT3608
FU1: library part FU, "Вставка плавкая", ManufacturerPartNumber=ВП1-2, Power/Voltage="0.25 А, 250 В", Specification=K, TU/GOST=ОЮ0.480.003ТУ-Р, Type="Вставка плавкая"
K1: library part "K Rele DPDT", "Реле", Specification=K, Type="Лампа вакуумная"
L1 L3: library part "Inductor Iron", "120mA 470uH ±10% 10.4? 1812 Inductors (SMD) ROHS", Manufacturer="FH (Guangdong Fenghua Advanced Tech)", Footprint Type=SMD, LCPN=C394141, Supplier=LC, Symbol=Inductor, Type=Inductors, URL=https://www.lcsc.com/product-detail/Inductors-SMD_FH-Guangdong-Fenghua-Advanced-Tech-FHW1812IF471KST_C394141.html
  L1: MFPN=FHW1812IF471KST
  L3: MFPN=B82472G6223M000
L2: library part "Inductor Iron", "Magnetic-Core Inductor", LatestRevisionDate=17-Jul-2002, LatestRevisionNote="Re-released for DXP Platform.", PackageDescription="Axial Device, Thru-Hole; 2 Leads; 0.9 in Pin Spacing", PackageReference=AXIAL-0.9, Published=24-Mar-1999, Publisher="Altium Limited"
Q1: "NPN Bipolar Transistor", Code_JEDEC=TO-226-AA, LatestRevisionDate=17-Jul-2002, LatestRevisionNote="Re-released for DXP Platform.", PackageDescription="TO, Flat Index; 3 In-Line, Axial Leads; Body Dia. 4.8mm; Leads 0.55 x 0.51 mm (max)", PackageReference=TO-226-AA, Published=8-Jun-2000, Publisher="Altium Limited"
Q2: library part NMOS-2_1, "N-Channel Power MOSFET", ComponentLink1Description="Manufacturer Link", ComponentLink1URL=http://www.irf.com/, DatasheetVersion=PD-9.814, LatestRevisionDate=17-Jul-2002, LatestRevisionNote="Re-released for DXP Platform.", Note="Pin 2 is electrically connected to pin 4.", PackageDescription="TO, Thru-Hole, Vertical, Heatsink Mounted; 3 In-Line Leads; Pitch 2.54 mm", PackageReference=TO-220AB, PackageVersion=Feb-1997, Published=8-Jun-2000, Publisher="Altium Limited"
Q3: library part NMOS-2, "N-Channel Power MOSFET", Manufacturer="Guangdong Hottech", Footprint Type=SMD, LCPN=C5364311, MFPN=IRLML6244, Supplier=LC, Symbol=MOSFET, Type=MOSFETs, URL=https://www.lcsc.com/product-detail/MOSFETs_Guangdong-Hottech-IRLML6244_C5364311.html
R1 R4: library part Res2, "125mW Thick Film Resistors ±100ppm/? ±1% 2.49k? 0805 Chip Resistor - Surface Mount ROHS", Manufacturer=YAGEO, Footprint Type=SMD, LCPN=C185290, MFPN=RC0805FR-072K49L, Supplier=LC, Symbol=Resistor, Type=Resistors, URL=https://www.lcsc.com/product-detail/Chip-Resistor-Surface-Mount_YAGEO-RC0805FR-072K49L_C185290.html
R2 R3: library part Res2, "125mW Thick Film Resistors ±100ppm/? ±5% 10k? 0805 Chip Resistor - Surface Mount ROHS", Manufacturer=YAGEO, Footprint Type=SMD, LCPN=C100047, MFPN=RC0805JR-0710KL, Supplier=LC, Symbol=Resistor, Type=Resistors, URL=https://www.lcsc.com/product-detail/Chip-Resistor-Surface-Mount_YAGEO-RC0805JR-0710KL_C100047.html
R5 R11: library part Res2, "125mW Thick Film Resistors ±100ppm/? ±1% 120? 0805 Chip Resistor - Surface Mount ROHS", Manufacturer=YAGEO, Footprint Type=SMD, LCPN=C114245, MFPN=RC0805FR-07120RL, Supplier=LC, Symbol=Resistor, Type=Resistors, URL=https://www.lcsc.com/product-detail/Chip-Resistor-Surface-Mount_YAGEO-RC0805FR-07120RL_C114245.html
R6 R8 R9 R10 R12 R16 R17 R18 R19 R20 R21 R23 R27 R28 R30 R31 R34 R35 R36 R37 R38 R39 R40 R41: library part R-4del, "Резистор", Manufacturer=Yageo, ManufacturerPartNumber=RC0805JR-07120R, Power/Voltage=0.125Вт, Tolerance=5%, Specification=K, Type=Резистор
R7 R13 R14 R15 R22 R24 R25 R29 R33 R46 R47 R48 R49 R50: library part Res2, "Resistor", LatestRevisionDate=17-Jul-2002, LatestRevisionNote="Re-released for DXP Platform.", PackageDescription="Axial Device, Thru-Hole; 2 Leads; 0.4 in Pin Spacing", PackageReference=AXIAL-0.4, Published=8-Jun-2000, Publisher="Altium Limited"
R26 R32 R43 R44: library part Res2, "125mW Thick Film Resistors ±100ppm/? ±5% 4.7k? 0805 Chip Resistor - Surface Mount ROHS", Manufacturer=YAGEO, Footprint Type=SMD, LCPN=C105427, MFPN=RC0805JR-074K7L, Supplier=LC, Symbol=Resistor, Type=Resistors, URL=https://www.lcsc.com/product-detail/Chip-Resistor-Surface-Mount_YAGEO-RC0805JR-074K7L_C105427.html
R42: library part R, "Резистор", Manufacturer=Yageo, ManufacturerPartNumber=RC0805JR-07120R, Power/Voltage=0.125Вт, Tolerance=5%, Specification=K, Type=Резистор
R45: library part Res2, "125mW Thick Film Resistors ±100ppm/? ±5% 1k? 0805 Chip Resistor - Surface Mount ROHS", Manufacturer=YAGEO, Footprint Type=SMD, LCPN=C100046, MFPN=RC0805JR-071KL, Supplier=LC, Symbol=Resistor, Type=Resistors, URL=https://www.lcsc.com/product-detail/Chip-Resistor-Surface-Mount_YAGEO-RC0805JR-071KL_C100046.html
RN1 RN2: library part YC124-JR-071KL, "1k Ohm A±5% 62.5mW Power Per Element Isolated Resistor Network/Array A±200ppm/A°C 0804, Convex, Long Side Terminals", Package="0804 Yageo", Arrow_Electronics-Purchase-URL=https://snapeda.com/shop?store=Arrow+Electronics&id=496240, Availability=Good, DigiKey-Purchase-URL=https://snapeda.com/shop?store=DigiKey&id=496240, MF=Yageo, Mouser-Purchase-URL=https://snapeda.com/shop?store=Mouser&id=496240, MP=YC124-JR-071KL, Price=None, SnapEDA_Link=https://www.snapeda.com/parts/YC124-JR-071KL/Yageo/view-part/496240/?ref=snap
U1: library part TP4056, "Complete single cell Li-Ion battery with a constant current / constant voltage linear charger", Package=Package, Availability="Not in stock", Check_prices=https://www.snapeda.com/parts/TP4056/NanJing+Top+Power+ASIC+Corp./view-part/?ref=eda, MF="NanJing Top Power ASIC Corp.", MP=TP4056, Price=None, SnapEDA_Link=https://www.snapeda.com/parts/TP4056/NanJing+Top+Power+ASIC+Corp./view-part/?ref=snap
U2: "Sot223/Pkg 1-Amp 5-Volt Low Drop Out Voltage Regulatator", Package=None, Availability=Unavailable, MP=AMS1117, Price=None
VD1: library part Diode, "Default Diode", Code_JEDEC=DO-214-AB, LatestRevisionDate=17-Jul-2002, LatestRevisionNote="Re-released for DXP Platform.", PackageDescription="DO-214-AB/SMC; 2 C-Bend Leads; Body 7.9 x 5.9 mm, inc. leads (LxW)", PackageReference=SMC, PackageVersion=Sep-1996, Published=8-Jun-2000, Publisher="Altium Limited"
VD2 VD3 VD4 VD5 VD6: library part "VD Diod", "Диод", Specification=K, Type=Диод
VR1: library part XL6009, "The XL6009 regulator is a wide input range, current mode, DC/DC converter which is capable of generating either positive or negative output voltages.", Package="TO-263-5L XLSEMI", Availability="Not in stock", Check_prices=https://www.snapeda.com/parts/XL6009/XLSEMI/view-part/?ref=eda, MF=XLSEMI, MP=XL6009, Price=None, SnapEDA_Link=https://www.snapeda.com/parts/XL6009/XLSEMI/view-part/?ref=snap
VT1 VT4: library part NMOS-2, "N-Channel Power MOSFET", ComponentLink1Description="Manufacturer Link", ComponentLink1URL=http://www.irf.com/, DatasheetVersion=PD-9.814, LatestRevisionDate=17-Jul-2002, LatestRevisionNote="Re-released for DXP Platform.", Note="Pin 2 is electrically connected to pin 4.", PackageDescription="TO, Thru-Hole, Vertical, Heatsink Mounted; 3 In-Line Leads; Pitch 2.54 mm", PackageReference=TO-220AB, PackageVersion=Feb-1997, Published=8-Jun-2000, Publisher="Altium Limited"
VT2 VT3: library part "VT Transistor NMOS", "Транзистор полевой n-канальный", Specification=K, Type=Транзистор
VT5 VT6 VT7 VT8: "Транзистор IGBT"
X1 X2: library part XP-PBS-2, "Гнездо 2-контакта", ManufacturerPartNumber=PBS-2-2.54, Specification=K, Type=Розетка
XP1 XP2 XP3 XP4 XP5 XP6: library part XP-PLS-1, "Контакт", ManufacturerPartNumber=PBS-1-2.54, Specification=K, Type=Вилка
XS1 XS4: library part PLS-2, "2 Straight pin 1 3.5mm 1x2P Green Board Edge/Receptacle-Close Plugin,P=3.5mm Pluggable System Terminal Block ROHS", Manufacturer="Ningbo Kangnex Elec", Footprint Type=DIP, LCPN=C192777, MFPN=WJ15EDGVC-3.5-2P, Supplier=LC, Symbol=Connector, Type=Connectors, URL=https://www.lcsc.com/product-detail/Pluggable-System-Terminal-Block_Ningbo-Kangnex-Elec-WJ15EDGVC-3-5-2P_C192777.html
XS2: library part "PLS-10 GBT", Manufacturer=Confly, Footprint Type=DIP, MFPN=CWF-8R, Supplier=LC, Symbol=Connector, Type=Connectors
XS3 XS5 XS6: library part PLS-4_1, "Plugin,P=3.5mm Pluggable System Terminal Block ROHS", Manufacturer="Ningbo Kangnex Elec", Footprint Type=DIP, LCPN=C5241856, MFPN=WJ15EDGVC-3.5-4P, Supplier=LC, Symbol=Connector, Type=Connectors, URL=https://www.lcsc.com/product-detail/Pluggable-System-Terminal-Block_Ningbo-Kangnex-Elec-WJ15EDGVC-3-5-4P_C5241856.html
XS*1: library part PLS-6
ZQ1: library part XTAL, "8MHz 20pF ±20ppm HC-49S Crystals ROHS", Manufacturer="Yangxing Tech", Footprint Type=Dip, LCPN=C21263, MFPN=X49SD8MSD2SC, Supplier=LC, Symbol=Crystal, Type=Crystals, URL=https://www.lcsc.com/product-detail/Crystals_Yangxing-Tech-X49SD8MSD2SC_C21263.html

## Via types
v1: diameter 1.27, hole 0.711, Top Layer to Bottom Layer, 3 vias

## Nets (pads, with @x,y where several pads share a name; then routed paths per layer and width w, separated by ;. In a path a pad name is that pad's centre, name@x,y a point inside that pad or via, vN(x,y) a via of type N, cw(c..) or ccw(c..) an arc to the next point about the centre after c; other vN are vias at no path point)
+3.3: C5.1 C15.1 C18.1 C19.1 C20.1 C21.1 DA2.1 DA4.6 DA4.11 DA4.19 DA4.21 DA4.22 DA4.28 DA4.50 DA4.75 DA4.100 R26.2 R43.1 R45.2 U2.2 U2.4 XS5.1 | length 12.7
  Top Layer w1: C15.1 52.205,103.05 U2.4 U2.2
+5: C8.1 C16.1 C17.1 C23.1 D6.2 DA1.2 DA3.1 DD1.14 R47.2 U2.3 VR1.4 X2.1 | length 69.2
  Top Layer w1: C23.1 47.25,106.75 D6.2 57,101.85 C16.1 ; U2.3 54.54,98.29 56,99.75 C16.1 ; C17.1 61,102 58.75,99.75 ; VR1.4 80.95,93.95 81,94 83,94 84,93 84,89 82.5,87.5 74,87.5 72.5,89 72.5,93.75 70.75,95.5 66.542,95.5 62.292,99.75 58.75,99.75 ; C16.1 58.75,99.75
+5V: XS3.3
+12: C22.1 C24.2 D5.2 DD1.12 K1.1 Q2.2 R2.2 R48.2 VD6.2 X1.1 | length 20.3
  Top Layer w0.5: R48.2 68.5,101.65 D5.2
  Top Layer w2: C22.1 68.35,112 C24.2 69.75,110.5 D5.2
+B: C1.1 C25.1 L2.1 R29.2 R46.2 U1.5 XS1.1 XS*1.2 | length 94.6
  Top Layer w1: U1.5 43.025,110.475 C1.1 45,112 45,118 46,119 53,119 54,120 54,125 53.5,125.5 ; R46.2 72.5,109 74.25,110.75 74.25,114.2 L2.1
  Top Layer w2: XS*1.2 37,124 38.5,125.5 53.5,125.5 58.5,125.5 59,125 XS1.1
  Top Layer w3.5: 60,122.5 76.05,122.5 L2.1
-B: C1.2 C2.1 C5.2 C6.2 C7.2 C8.2 C9.1 C11.2 C12.2 C13.2 C14.2 C15.2 C16.2 C17.2 C18.2 C19.2 C20.2 C21.2 C22.2 C23.2 C24.1 C25.2 C26.2 D4.2 DA1.1 DA2.4 DA3.2 DA4.10 DA4.20 DA4.27 DA4.74 DA4.99 DA5.2 DD1.2 DD1.4 DD1.7 DD1.11 DD1.13 Q3.2 R3.1 R6.1 R7.1 R10.2 R12.2 R22.1 R24.1 R25.1 R27.1 R28.1 R31.1 R32.1 R33.1 R42.1 R44.1 R49.1 R50.1 U1.1 U1.3 U1.9 U2.1 VR1.1 VT1.2 VT2.3 VT3.3 VT4.2 XP6.1 XS2.2 XS2.8 XS3.2 XS4.2 XS5.4 XS6.2 XS*1.1 XS*1.3 | length 19.3
  Top Layer w0.3: R7.1@37.35,103.25 37.35,105.52 U1.1 37.345,107.595 37.75,108 U1.9 39.885,107.365 U1.3
  Top Layer w0.7: R50.1 49.618,111.018 49.618,111.489 49.883,111.754 50,111.754 DA5.2
  Top Layer w1: C15.2 46.905,96.405 U2.1 ; C26.2 47,110.75 47.25,110.5 R50.1
ADC1: DA4.24 R15.1 R25.2
B: D2.2 Q1.6 RN2.6
CAN_N: D1.2 DA2.6 R11.1 XS2.10
CAN_P: D1.3 DA2.7 R11.2 XS2.9
CANRX_N: DA2.3 DA4.92
CANRX_P: DA2.2 DA4.91
CVCC: C2.2 Q1.1 Q1.4 RN1.1 RN1.2 RN1.3 RN1.4 U1.4 U1.8 XS*1.4 | length 42.3
  Top Layer w0.3: Q1.4 37.345,115.7 ; 37.345,113 38.095,113.75 Q1.1@38.6,113.75 ; RN1.4 RN1.3 ; 41.75,119.25 41.5,119 41.5,118.5 41.35,118.35 RN1.3 ; RN1.1 RN1.2 RN1.3
  Top Layer w0.7: U1.4 41.155,102.155 40.5,101.5 36.5,101.5 35.75,102.25 35.75,108.88 U1.8 37.345,113 37.345,115.7 37.345,117.595 39,119.25 41.75,119.25 42,119.5 XS*1.4
D1: DA4.16 R1.2
D2: DA4.34 R5.1
Fan: DD1.17 R8.1
G: DA4.40 RN2.7
I: R30.1 R31.2
IO14: DA4.18 XS2.7
NetC3_1: C3.1 C4.1 DA1.4 DA2.8
NetC3_2: C3.2 C4.2 D1.1 DA1.3 DA2.5
NetC6_1: C6.1 DD1.16 X2.2
NetC7_1: C7.1 DD1.15 R16.2 R23.1 R27.2
NetC9_2: C9.2 DA3.3 R30.2
NetC10_1: C10.1 K1.3 R21.1 XP3.1
NetC10_2: C10.2 DD1.5 K1.6 R37.2 VT6.3 VT7.2
NetC11_1: C11.1 DA4.12 ZQ1.2
NetC12_1: C12.1 DA4.13 ZQ1.1
NetC13_1: C13.1 DA4.73
NetC14_1: C14.1 DA4.49
NetD2_1: D2.1 DA4.38
NetD3_1: D3.1 DA4.39
NetD4_1: D4.1 R45.1
NetD5_1: D5.1 L2.2 VR1.3 VR1.6 | length 16.7
  Top Layer w1: VR1.3 VR1.6
  Top Layer w4: L2.2 79.25,107.75 VR1.6
NetD6_1: D6.1 DA5.1 L3.1 | length 12.3
  Top Layer w0.5: DA5.1 49.146,112.646 49.146,113.184 49.466,113.504 50.638,113.504 50.688,113.554 51.996,113.554 L3.1
  Top Layer w1: L3.1 55.75,107.4 D6.1
NetDA3_4: DA3.4 FU1.2
NetDA3_5: DA3.5 VT5.2 VT6.2
NetDA4_14: DA4.14 R43.2
NetDA4_25: DA4.25 R29.1 R33.2
NetDA4_37: DA4.37 R32.2
NetDA4_72: DA4.72 XS5.3
NetDA4_76: DA4.76 XS5.2
NetDA4_94: DA4.94 R44.2
NetDA5_3: DA5.3 R47.1 R50.2 | length 5.3
  Top Layer w1: R47.1 49.896,109.046 50.454,109.046 50.454,109.604 50.9,110.05 R50.2 50.9,111.093 51.143,111.336 51.143,112.55 DA5.3@51.104,112.55
NetDD1_1: DD1.1 R40.2 R41.2 R42.2 VT7.3 VT8.3
NetDD1_3: DD1.3 R38.1 VD4.2
NetDD1_6: DD1.6 R35.1 VD2.2
NetDD1_8: DD1.8 R39.1 VD5.2
NetDD1_9: DD1.9 R36.2 VT5.3 VT8.2 XP2.1
NetDD1_10: DD1.10 R34.1 VD3.2
NetFU1_1: FU1.1 XP1.1
NetK1_4: K1.4 XP4.1
NetK1_5: K1.5 XP5.1
NetK1_8: K1.8 VD6.1 VT3.2
NetL1_1: L1.1 R13.1 R15.2 VD1.1
NetL1_2: L1.2 R13.2 XS2.6
NetQ1_2: Q1.2 RN1.7 RN1.8 U1.6 | length 9.9
  Top Layer w0.3: 39.25,114.75 Q1.2 38.631,114.719 41.786,114.719 42.069,114.436 42.069,113.946 RN1.7 ; U1.6 39.885,111.135 40.614,111.864 40.864,111.864 42.15,113.15 RN1.7 ; RN1.8@42.7,113.865 RN1.7
NetQ1_5: Q1.5 RN1.5 RN1.6 U1.7 | length 11.7
  Top Layer w0.3: v1(34.5,114.75) Q1.5 ; U1.7 38.615,111.93 RN1.5
  Bottom Layer w0.3: v1(34.5,114.75) 37.5,114.75 39,113.25 v1(39,112.5)
NetQ2_1: Q2.1 R2.1 R4.1
NetQ2_3: Q2.3 XS2.4
NetQ3_1: Q3.1 R5.2
NetQ3_3: Q3.3 XS2.5
NetR1_1: R1.1 R3.2 VT1.1
NetR4_2: R4.2 VT1.3
NetR6_2: R6.2 XS2.3
NetR7_2: R7.2 U1.2 | length 2.5
  Top Layer w0.3: U1.2 38.615,104.635 39.15,104.1 R7.2@39.15,103.25
NetR8_2: R8.2 R10.1 VT2.1
NetR9_2: R9.2 R12.1 VT3.1
NetR14_1: R14.1 R24.2 VD1.2
NetR14_2: R14.2 VT4.3
NetR16_1: R16.1 R17.2
NetR17_1: R17.1 R18.2
NetR18_1: R18.1 R19.2
NetR19_1: R19.1 R20.2
NetR20_1: R20.1 R21.2
NetR23_2: R23.2 R28.2
NetR34_2: R34.2 R36.1 VD3.1 VT5.1
NetR35_2: R35.2 R37.1 VD2.1 VT6.1
NetR38_2: R38.2 R40.1 VD4.1 VT7.1
NetR39_2: R39.2 R41.1 VD5.1 VT8.1
NetR46_1: R46.1 VR1.2 | length 11.9
  Top Layer w1: R46.1 72.5,96.939 74.189,95.25 76,95.25 77.55,93.7 VR1.2
NetR48_1: R48.1 R49.2 VR1.5 | length 28.1
  Top Layer w0.5: R49.2 R48.1 67,98 68.496,96.504 71.166,96.504 74,93.67 74,89.5 74.996,88.504 82.004,88.504 82.65,89.15 VR1.5
NetRN2_1: RN2.1 XS6.1
NetRN2_2: RN2.2 XS6.3
NetRN2_3: RN2.3 XS6.4
NetVT2_2: VT2.2 X1.2
OUT+: C26.1 DA5.4 DA5.5 L3.2 XS1.2 XS3.1 | length 16.2
  Top Layer w0.7: DA5.5@49.979,114.971 DA5.5
  Top Layer w1: C26.1 47,116.5 47.25,116.75 L3.2 55.75,121.75 XS1.2
PC6: DA4.33 R22.2 VT4.1
PE1: DA4.98 R26.1 XS4.1
PWM: DA4.17 XS3.4
R: D3.2 Q1.3 RN2.8 | length 1.8
  Top Layer w0.3: Q1.3 38.6,116.6 v1(39.25,117.25)
Relay: DA4.97 R9.1
UART_N: DA4.64 XS*1.6
UART_P: DA4.63 XS*1.5
pads on no net: DA3.4_1 DA3.4_2 DA3.4_3 DA3.4_4 DA3.4_5 DA3.4_6 DA3.4_7 DA3.4_8 DA3.4_9 DA3.4_10 DA3.4_11 DA3.4_12 DA3.4_13 DA3.4_14 DA3.4_15 DA3.4_16 DA3.5_1 DA3.5_2 DA3.5_3 DA3.5_4 DA3.5_5 DA3.5_6 DA3.5_7 DA3.5_8 DA3.5_9 DA3.5_10 DA3.5_11 DA3.5_12 DA3.5_13 DA3.5_14 DA3.5_15 DA3.5_16 DA4.1 DA4.2 DA4.3 DA4.4 DA4.5 DA4.7 DA4.8 DA4.9 DA4.15 DA4.23 DA4.26 DA4.29 DA4.30 DA4.31 DA4.32 DA4.35 DA4.36 DA4.41 DA4.42 DA4.43 DA4.44 DA4.45 DA4.46 DA4.47 DA4.48 DA4.51 DA4.52 DA4.53 DA4.54 DA4.55 DA4.56 DA4.57 DA4.58 DA4.59 DA4.60 DA4.61 DA4.62 DA4.65 DA4.66 DA4.67 DA4.68 DA4.69 DA4.70 DA4.71 DA4.77 DA4.78 DA4.79 DA4.80 DA4.81 DA4.82 DA4.83 DA4.84 DA4.85 DA4.86 DA4.87 DA4.88 DA4.89 DA4.90 DA4.93 DA4.95 DA4.96 DA5.6 K1.2 K1.7 RN2.4 RN2.5 XS2.1

## Silkscreen, mask and mechanical layers (free items; w line width, h text height)
Bottom Overlay:
  lines w0.254: 30,30 30,110 130,110 130,30 30,30

## Text inside footprints (layer, text, board x,y; h text height)
FU1: Top Overlay "10x38" at 45.9,80.6 h1.52; Top Overlay "Fuse" at 47,74 h1.52
VT5: Bottom Overlay "G" at 83.5,49.5 h1.52
VT6: Bottom Overlay "G" at 63.4,49.6 h1.52
VT7: Bottom Overlay "G" at 42.9,49.6 h1.52
VT8: Bottom Overlay "G" at 104.9,49.6 h1.52